# Altium PCB OpenRex_V1I1_PCB.PcbDoc (part 11 of 12)
Units mm, origin at the board's own origin, x right, y up, seen from the top; angles counter-clockwise.
Board outline 70 x 95 mm, 10 copper layers (L1, L2, L3, L4 (PWR), L5 (PWR), L6 (PWR), L7 (PWR), L8, L9, L10), stack 1.632 mm thick; 1080 components, 708 nets, 3831 pads, 2373 vias.
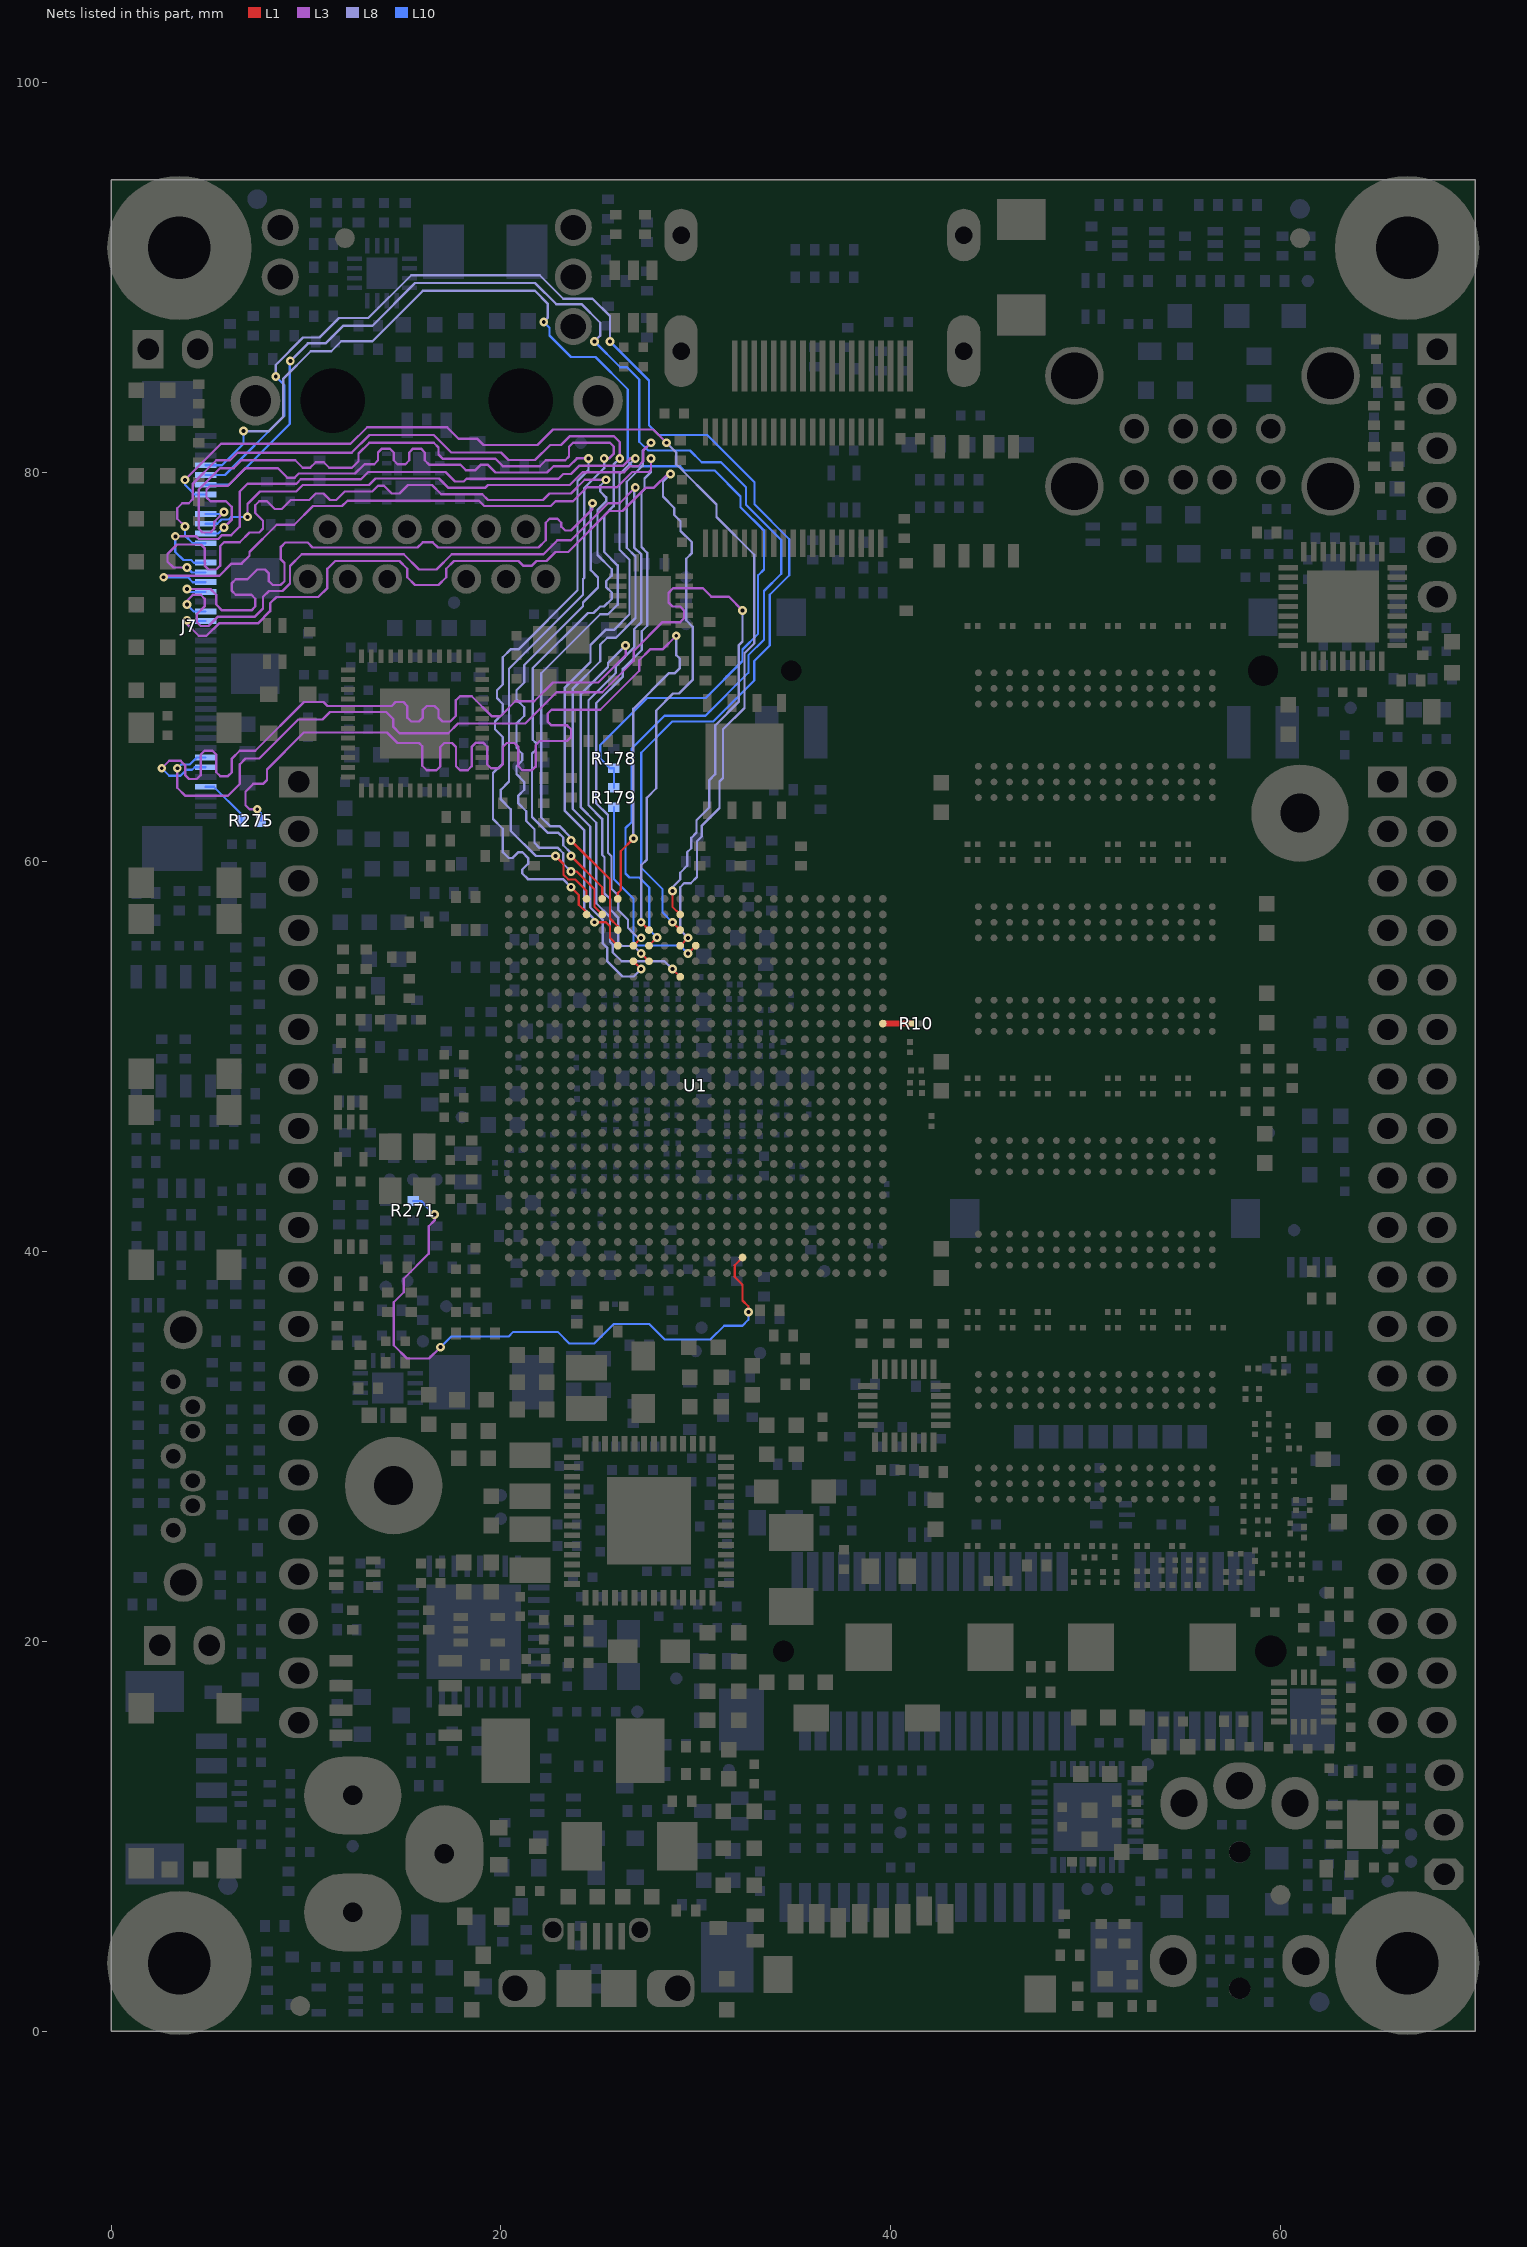
[diagram p19: the nets of this part, all layers, seen from the top]

## Via types
v1: diameter 0.45, hole 0.2, L1 to L10, tented both sides, 2369 vias
v2: diameter 1, hole 0.5, L1 to L10, tented top, 4 vias

## Nets (pads, with @x,y where several pads share a name; then routed paths per layer and width w, separated by ;. In a path a pad name is that pad's centre, name@x,y a point inside that pad or via, vN(x,y) a via of type N, cw(c..) or ccw(c..) an arc to the next point about the centre after c; other vN are vias at no path point) (continued)
VID_IN_CSI1_D10: J7.21 U1.K23 | length 58.1
  L1 w0.114: v1(27.2,56.9) U1.K23@27.6,56.5
  L3 w0.12: v1(3.9,72.4) 3.9,72.2 4.5,71.6 4.9,71.6 5.535,72.235 7.535,72.235 8.163,72.863 8.163,73.263 8.491,73.591 10.635,73.591 11.1,74.056 11.1,75.035 11.5,75.435 14.8,75.435 15.2,75.035 15.2,74.6 15.6,74.2 16.8,74.2 17.2,74.6 17.2,75.035 17.6,75.435 20.9,75.435 21.135,75.2 21.6,75.2 21.835,75.435 22.335,75.435 22.8,75.9 23.456,75.9 25.556,78 26.244,78 27.444,79.2 27.86,79.2 28.56,79.9 v1(28.7,79.9)
  L8 w0.12: v1(27.2,56.9) 27.2,59.828 27.491,60.119 27.491,63.291 27.972,63.772 27.972,67.769 28.838,68.635 29.135,68.635 29.837,69.337 29.837,72.063 29.509,72.391 29.509,75.553 29.8,75.844 29.8,76.4 29.22,76.98 29.22,77.48 28.9,77.8 28.9,78.156 28.315,78.741 28.315,79.515 v1(28.7,79.9)
  L10 w0.114: v1(3.9,72.4) 3.95,72.35 J7.21@4.85,72.35
VID_IN_CSI1_D11: J7.22 U1.K21 | length 58.1
  L1 w0.114: v1(27.2,55.3) U1.K21@27.6,54.9
  L3 w0.12: v1(3.9,73.2) 3.9,73.4 4.2,73.7 4.6,73.7 4.8,73.5 4.8,73.1 4.4,72.7 4.4,72.3 4.6,72.1 5,72.1 5.467,72.568 7.363,72.568 7.8,73.004 7.8,73.6 8.1,73.9 8.796,73.9 9.182,74.286 9.182,75.182 9.783,75.783 15.017,75.783 15.8,75 16.7,75 17.483,75.783 22.183,75.783 22.9,76.5 23.6,76.5 25.5,78.4 26.1,78.4 v1(26.9,79.2)
  L8 w0.12: v1(26.9,79.2) 26.838,79.138 26.838,76.133 27.21,75.762 27.21,72.31 26.838,71.938 26.838,70.994 25.9,70.056 25.9,69.7 24.495,68.295 24.495,62.905 25.195,62.205 25.195,60.364 25.32,60.239 25.32,58.38 25.61,58.09 25.61,57.55 26.015,57.145 26.015,55.885 26.215,55.685 26.815,55.685 v1(27.2,55.3)
  L10 w0.114: v1(3.9,73.2) 4.25,72.85 J7.22@4.85,72.85
VID_IN_CSI1_D12: J7.24 U1.G24 | length 58
  L1 w0.114: v1(23.6,59.5) 23.9,59.5 24.8,58.6 24.8,57.7 U1.G24@25.2,57.3
  L3 w0.12: v1(3.9,74) 5.1,74 5.4,73.7 5.4,73.2 5.7,72.9 7.2,72.9 7.4,73.1 7.4,73.5 7.2,73.7 6.4,73.7 6.2,73.9 6.2,74.3 6.4,74.5 7,74.5 7.5,75 7.9,75 8.1,74.8 8.1,74.4 8.3,74.2 8.7,74.2 8.9,74.4 8.9,75.326 8.715,75.511 8.715,76.159 8.941,76.385 10.088,76.385 10.342,76.131 15.731,76.131 16,76.4 16.5,76.4 16.769,76.131 21.931,76.131 22.3,76.5 22.3,77.4 22.5,77.6 22.9,77.6 23.1,77.4 23.1,77.2 23.3,77 23.6,77 24.7,78.1 v1(24.7,78.4)
  L8 w0.12: v1(23.6,59.5) 23.2,59.9 23.2,60.444 22.929,60.715 21.985,60.715 21.725,60.975 21.725,61.675 21.3,62.1 21.3,62.6 20.9,63 20.9,63.4 21.2,63.7 21.2,64.1 20.8,64.5 20.8,64.9 21.1,65.2 21.1,65.55 20.8,65.85 20.8,67.1 21.2,67.5 21.2,67.935 20.8,68.335 20.8,68.8 21.2,69.2 21.2,70.1 24.215,73.115 24.215,73.309 24.985,74.079 24.985,74.594 24.617,74.962 24.617,78.317 v1(24.7,78.4)
  L10 w0.114: v1(3.9,74) 4.05,73.85 J7.24@4.85,73.85
VID_IN_CSI1_D13: J7.25 U1.J22 | length 58.1
  L1 w0.114: U1.J22@26.8,55.7 v1(27.2,56.1)
  L3 w0.12: v1(2.7,74.6) 2.78,74.68 5.56,74.68 6.18,75.3 6.7,75.3 7.1,75.7 7.1,75.9 8.5,77.3 9.4,77.3 10.355,78.255 11.855,78.255 12.129,78.529 18.871,78.529 19.145,78.255 22.555,78.255 22.8,78.5 23.7,78.5 24.415,79.215 25.951,79.215 26.736,80 27.6,80 27.7,80.1 v1(27.7,80.7)
  L8 w0.12: v1(27.2,56.1) 27.045,56.1 26.525,56.62 26.525,57.031 26.015,57.541 26.015,58.285 25.68,58.62 25.68,60.29 25.5,60.47 25.5,62.4 24.899,63.001 24.899,68.143 26.26,69.504 26.26,69.9 27.233,70.873 27.233,71.833 27.515,72.115 27.515,72.599 27.515,75.853 27.215,76.153 27.215,78.959 27.372,79.117 27.372,79.668 27.7,79.996 v1(27.7,80.7)
  L10 w0.114: v1(2.7,74.6) 3.944,74.6 4.194,74.35 J7.25@4.85,74.35
VID_IN_CSI1_D14: J7.26 U1.G25 | length 58.1
  L1 w0.114: v1(23.6,60.3) 25.2,58.7 U1.G25@25.2,58.1
  L3 w0.12: v1(3.9,75.1) 3.2,75.1 2.9,75.4 2.9,75.8 3.385,76.285 4.615,76.285 4.8,76.1 4.8,75.2 5,75 5.4,75 5.6,75.2 5.6,76.206 5.603,76.208 ; 5.606,76.206 5.8,76.4 6.6,76.4 7.1,76.9 7.6,76.9 7.8,77.1 7.8,77.5 7.4,77.9 7.4,78.3 7.6,78.5 8,78.5 8.4,78.1 8.756,78.1 9.221,78.565 10.165,78.565 10.5,78.9 10.9,78.9 11.235,78.565 11.559,78.565 11.994,79 13.4,79 13.7,79.3 14,79.3 14.4,78.9 14.8,78.9 15.235,79.335 16.465,79.335 16.942,78.858 19.042,78.858 19.335,78.565 22.165,78.565 22.5,78.9 23.6,78.9 24.3,79.6 v1(25.4,79.6)
  L8 w0.12: v1(23.6,60.3) 23.6,60.455 23.2,60.855 23.2,61.244 22.959,61.485 22.415,61.485 21.6,62.3 21.6,65.556 21.8,65.756 21.8,66.1 21.638,66.262 21.638,69.938 24.465,72.765 24.759,72.765 25.094,73.1 25.294,73.1 25.685,73.491 25.685,73.815 25.4,74.1 25.4,74.4 25.685,74.685 25.685,75.015 24.959,75.741 24.959,78.048 25.4,78.489 25.4,78.7 25.1,79 25.1,79.3 v1(25.4,79.6)
  L10 w0.114: v1(3.9,75.1) 4.15,74.85 J7.26@4.85,74.85
VID_IN_CSI1_D15: J7.27 U1.H22 | length 58.1
  L1 w0.114: v1(24.8,56.9) 25.4,56.9 25.6,56.7 25.6,56.1 U1.H22@26,55.7
  L3 w0.12: v1(3.3,76.7) 4.365,76.7 4.5,76.565 5.5,76.565 5.7,76.765 6.165,76.765 6.6,77.2 6.6,79 7,79.4 9.51,79.4 9.738,79.628 12.828,79.628 13.2,80 17.156,80 17.641,79.515 18.1,79.515 18.24,79.655 22.955,79.655 23.2,79.9 23.6,79.9 24.015,80.315 26.259,80.315 26.644,80.7 v1(26.9,80.7)
  L8 w0.12: v1(24.8,56.9) 24.8,57.048 24.287,57.562 24.287,61.613 23.285,62.615 23.285,68.941 24.6,70.256 24.6,71.132 25.368,71.9 25.8,71.9 26.6,72.7 26.6,75.5 26.085,76.015 26.085,79.885 v1(26.9,80.7)
  L10 w0.114: v1(3.3,76.7) 3.3,75.9 3.715,75.485 4.115,75.485 4.25,75.35 J7.27@4.85,75.35
VID_IN_CSI1_D16: J7.29 U1.H23 | length 58.1
  L1 w0.114: v1(23.6,61.1) 25.6,59.1 25.6,57.096 26,56.696 U1.H23@26,56.5
  L3 w0.12: v1(3.8,77.2) 3.4,77.6 3.4,78.144 3.656,78.4 3.985,78.4 4.185,78.6 4.185,79.385 5.4,80.6 6.1,80.6 6.485,80.985 12.345,80.985 13.26,81.9 16.556,81.9 17.456,81 20,81 20.385,80.615 20.9,80.615 21.759,80.615 22.529,81.385 23.085,81.385 23.543,81.843 25.791,81.843 26.1,81.533 v1(26.1,80.7)
  L8 w0.12: v1(23.6,61.1) 23.6,61.24 23.005,61.835 22.525,61.835 22.077,62.283 22.077,65.636 22.08,65.64 22.08,66.216 22.077,66.219 22.077,69.673 25.104,72.7 25.5,72.7 25.99,73.19 25.99,75.21 25.3,75.9 25.3,77.768 25.785,78.253 25.785,80.385 v1(26.1,80.7)
  L10 w0.114: v1(3.8,77.2) 3.8,76.744 4.194,76.35 J7.29@4.85,76.35
VID_IN_CSI1_D17: J7.30 U1.F24 | length 58.1
  L1 w0.114: v1(23.6,58.7) 24,58.3 24,57.8 24.4,57.4 U1.F24@24.4,57.3
  L3 w0.12: v1(5.8,77.15) 6.185,77.535 6.185,78.215 5.9,78.5 5.1,78.5 4.9,78.7 4.9,79.1 5.1,79.3 6,79.3 6.9,80.2 8.556,80.2 9.041,79.715 9.429,79.715 9.635,79.922 12.522,79.922 13,80.4 13.5,80.4 13.7,80.6 13.7,81 13.9,81.2 14.3,81.2 14.5,81 14.5,80.6 14.7,80.4 15.1,80.4 15.3,80.6 15.3,81 15.5,81.2 15.9,81.2 16.1,81 16.1,80.6 16.32,80.38 17.92,80.38 18.2,80.1 18.7,80.1 18.98,80.38 19.32,80.38 19.725,79.975 22.375,79.975 22.7,80.3 23.5,80.3 23.9,80.7 v1(24.5,80.7)
  L8 w0.12: v1(23.6,58.7) 23.185,59.115 21.385,59.115 21.1,59.4 21.1,59.6 21.4,59.9 21.4,60.2 21.1,60.5 20.9,60.5 20.6,60.2 20.4,60.2 20.1,60.5 20.1,61.7 19.6,62.2 19.6,64.556 20.1,65.056 20.1,66.4 19.7,66.8 19.7,67.2 20.1,67.6 20.1,68.1 19.8,68.4 19.8,68.8 20.1,69.1 20.1,70.5 20.5,70.9 20.9,70.9 23.935,73.935 23.935,79.535 24.5,80.1 v1(24.5,80.7)
  L10 w0.114: J7.30@4.85,76.85 5.5,76.85 v1(5.8,77.15)
VID_IN_CSI1_D18: J7.31 U1.J21 | length 58.1
  L1 w0.114: U1.J21@26.8,54.9 v1(27.2,54.5)
  L3 w0.12: v1(7,77.7) 7,78.36 7.64,79 9.506,79 9.841,79.335 13.235,79.335 13.567,79.667 16.833,79.667 17.314,79.186 19.192,79.186 19.341,79.335 23.535,79.335 24.185,79.985 26.325,79.985 26.64,80.3 27.044,80.3 27.3,80.556 27.3,81.1 v1(27.7,81.5)
  L8 w0.12: 23.688,68.896 23.688,62.712 24.588,61.812 24.588,57.656 25.22,57.024 25.22,55.82 25.465,55.575 25.465,54.891 26.241,54.115 26.815,54.115 v1(27.2,54.5) ; 23.7,68.896 25.1,70.296 25.1,71.144 25.456,71.5 25.9,71.5 26.905,72.505 26.905,75.671 26.462,76.114 26.462,79.506 27.285,80.329 27.285,81.085 v1(27.7,81.5)
  L10 w0.114: J7.31@4.85,77.35 5.456,77.35 5.671,77.565 6.035,77.565 6.17,77.7 v1(7,77.7)
VID_IN_CSI1_D19: J7.32 U1.F25 | length 58
  L1 w0.114: v1(22.8,60.3) 23.215,59.885 23.215,59.341 23.456,59.1 23.8,59.1 24.4,58.5 U1.F25@24.4,58.1
  L3 w0.12: v1(5.8,77.95) 5.3,77.45 5.3,77.1 5.1,76.9 4.7,76.9 4.5,77.1 4.5,79.1 5.6,80.2 6.3,80.2 6.7,80.6 9.456,80.6 9.841,80.215 10.215,80.215 10.5,80.5 10.915,80.5 11.2,80.215 12.359,80.215 12.7,80.556 12.7,80.944 13.256,81.5 16.56,81.5 16.8,81.26 16.8,80.9 17.01,80.69 19.71,80.69 20.105,80.295 21.995,80.295 22.3,80.6 23.3,80.6 23.5,80.8 23.5,81.3 23.7,81.5 25.6,81.5 25.8,81.3 25.8,80.944 25.556,80.7 v1(25.3,80.7)
  L8 w0.12: v1(22.8,60.3) 21.8,60.3 20.5,61.6 20.5,62.7 20,63.2 20,63.7 20.415,64.115 20.415,69.905 24.215,73.705 24.215,74.509 24.276,74.571 24.276,79.176 25.3,80.2 v1(25.3,80.7)
  L10 w0.114: J7.32@4.85,77.85 5.7,77.85 v1(5.8,77.95)
VID_IN_CSI1_DE: J7.34 U1.M22 | length 58.1
  L1 w0.114: U1.M22@29.2,55.7 v1(29.6,56.1)
  L3 w0.12: v1(3.8,79.6) 5.647,81.447 12.289,81.447 13.142,82.3 17.244,82.3 17.844,81.7 18.8,81.7 19.115,81.385 21.879,81.385 22.679,82.185 27.815,82.185 v1(28.5,81.5)
  L8 w0.12: v1(28.5,81.5) 29,81 29,80.4 31.065,78.335 31.065,77.691 33,75.756 33,71.2 32.5,70.7 32.5,67.9 31.4,66.8 31.4,64.3 31.215,64.115 31.215,62.759 30.315,61.859 30.315,61.315 30.06,61.06 30.06,59.216 29.744,58.9 29.4,58.9 29.2,58.7 29.2,56.5 v1(29.6,56.1)
  L10 w0.114: v1(3.8,79.6) 3.8,79.344 4.294,78.85 J7.34@4.85,78.85
VID_IN_CSI1_HSYNC: J7.6 U1.M20 | length 58.2
  L1 w0.114: v1(28.8,54.5) U1.M20@29.2,54.1
  L3 w0.12: v1(2.6,64.8) 2.985,65.185 3.571,65.185 3.8,64.956 3.8,64.45 4,64.25 4.4,64.25 4.6,64.45 4.6,65.5 4.8,65.7 5.2,65.7 5.4,65.5 5.4,64.6 5.6,64.4 6,64.4 6.2,64.6 6.2,65.3 6.6,65.7 7.4,65.7 9.9,68.2 10.9,68.2 11.1,68 14.4,68 14.6,68.2 15,68.2 15.2,68 15.2,67.4 15.4,67.2 15.8,67.2 16,67.4 16,67.8 16.2,68 16.6,68 16.8,67.8 16.8,67.4 17,67.2 17.4,67.2 17.685,67.485 17.685,68.285 17.9,68.5 18.504,68.5 19.539,67.465 19.965,67.465 20.735,68.235 21.712,68.235 22.677,69.2 25,69.2 26.4,70.6 v1(26.4,71.1)
  L8 w0.12: v1(26.4,71.1) 25.5,70.2 25.5,70 24.092,68.592 24.092,62.808 24.89,62.01 24.89,57.874 25.6,57.164 25.6,55.904 25.745,55.759 25.745,55.355 26.2,54.9 28.4,54.9 v1(28.8,54.5)
  L10 w0.114: v1(2.6,64.8) 2.985,64.415 3.559,64.415 3.864,64.72 4.16,64.72 4.29,64.85 J7.6@4.85,64.85
VID_IN_CSI1_INT: J7.35 U1.K22 | length 71
  L1 w0.114: U1.K22@27.615,55.715 v1(28.015,56.115)
  L8 w0.12: v1(9.2,85.7) 10.1,86.6 11,86.6 11.9,87.5 13.4,87.5 15.6,89.7 21.756,89.7 22.842,88.614 24.144,88.614 25.1,87.659 25.1,87 v1(24.8,86.7)
  L10 w0.114: J7.35@4.85,79.35 6.05,79.35 9.164,82.464 9.164,85.664 v1(9.2,85.7) ; v1(24.8,86.7) 26.128,85.372 26.472,85.372 27.1,84.744 27.1,81.556 27.556,81.1 29.7,81.1 30.3,80.5 31.3,80.5 32.58,79.22 32.58,78.32 34.385,76.515 34.385,74.785 33.5,73.9 33.5,71.4 32.7,70.6 32.7,69.7 30.5,67.5 28.4,67.5 26.7,65.8 26.7,62.036 26.4,61.736 26.4,59.4 26.6,59.2 27.1,59.2 27.615,58.685 27.615,56.515 v1(28.015,56.115)
VID_IN_CSI1_INT2: J7.36 U1.M23 | length 70
  L1 w0.114: v1(28.8,56.9) U1.M23@29.2,56.5
  L8 w0.12: v1(8.45,84.9) 8.45,85.494 9.856,86.9 10.7,86.9 11.7,87.9 13.2,87.9 15.4,90.1 22,90.1 23.206,88.894 24.706,88.894 25.6,88 v1(25.6,86.7)
  L10 w0.114: J7.36@4.85,79.85 5.85,79.85 8.884,82.884 8.884,84.466 v1(8.45,84.9) ; v1(25.6,86.7) 27.6,84.7 27.6,82.4 28.1,81.9 30.596,81.9 33.015,79.481 33.015,78.341 34.8,76.556 34.8,74.7 33.8,73.7 33.8,71.1 33,70.3 33,69.3 30.9,67.2 28.8,67.2 27.2,65.6 27.2,59.7 28.3,58.6 28.3,57.4 v1(28.8,56.9)
VID_IN_CSI1_PIXCLK: R275.1 U1.H25 | length 55.7
  L1 w0.114: U1.H25@26,58.1 26,58.4 26.15,58.55 26.15,60.55 v1(26.8,61.2)
  L3 w0.12: v1(7.5,62.7) 7.1,62.7 6.9,62.9 6.9,63.6 7.3,64 7.8,64 8,64.2 8,64.744 9.891,66.635 14.165,66.635 14.7,66.1 15.8,66.1 15.965,65.935 15.965,64.935 16.2,64.7 16.7,64.7 16.895,64.895 16.895,65.895 17.1,66.1 17.5,66.1 17.7,65.9 17.7,64.895 ; 17.7,64.9 17.9,64.7 18.3,64.7 18.5,64.9 18.5,65.9 18.705,66.105 19.105,66.105 19.3,65.91 19.3,65 19.5,64.8 19.9,64.8 20.1,65 20.1,65.9 20.3,66.1 20.7,66.1 20.9,65.9 20.9,64.9 21.1,64.7 21.6,64.7 21.785,64.885 21.785,65.985 22,66.2 23.4,66.2 23.6,66.4 23.6,66.8 23.4,67 22.6,67 22.4,67.2 22.4,67.6 22.6,67.8 25.1,67.8 27.1,69.8 27.1,70.344 27.656,70.9 28.3,70.9 v1(29,71.6)
  L8 w0.12: v1(26.8,61.2) 26.8,67.856 28.629,69.685 28.929,69.685 29.185,69.941 29.185,70.423 29,70.608 v1(29,71.6)
  L10 w0.114: v1(7.5,62.7) 7.7,62.5 R275.1@7.7,62.1
VID_IN_CSI1_PIXCLK_R: J7.4 R275.2 | length 2.8
  L10 w0.114: J7.4@4.85,63.85 5.276,63.85 6.7,62.426 R275.2@6.7,62.1
VID_IN_CSI1_RSTN: J7.37 R178.1 R179.1 | length 61.4
  L8 w0.12: v1(6.8,82.1) 8.1,82.1 8.842,82.842 8.842,84.797 10.244,86.2 11.3,86.2 11.815,86.715 13.415,86.715 16,89.3 21.744,89.3 22.4,88.644 22.4,87.9 v1(22.2,87.7)
  L10 w0.114: J7.37@4.85,80.35 5.694,80.35 6.8,81.456 v1(6.8,82.1) ; v1(22.2,87.7) 22.5,87.4 22.5,87 23.6,85.9 24.856,85.9 26.515,84.241 26.515,80.541 26.756,80.3 29.2,80.3 29.415,80.085 30.959,80.085 32.3,78.744 32.3,78.2 33.5,77 33.5,75 33.2,74.7 33.2,71.7 32.4,70.9 32.4,70.3 30.5,68.4 27.5,68.4 25.1,66 25.1,65.3 25.6,64.8 R178.1@25.8,64.8 R179.1@25.8,63.8
VID_IN_CSI1_RSTN_R: R179.2 U1.N22 | length 10.9
  L1 w0.114: v1(29.6,55.3) U1.N22@30,55.7
  L10 w0.114: R179.2@25.8,62.8 25.8,59.1 26.8,58.1 26.8,55.9 26.985,55.715 29.185,55.715 v1(29.6,55.3)
VID_IN_CSI1_VSYNC: J7.7 U1.M24 | length 58.1
  L1 w0.114: v1(28.8,58.5) 28.8,57.7 U1.M24@29.2,57.3
  L3 w0.12: v1(3.4,64.8) 3.4,63.8 3.815,63.385 5.985,63.385 6.6,64 6.6,65 6.9,65.3 7.6,65.3 9.6,67.3 10.844,67.3 11.229,67.685 14.115,67.685 14.485,67.315 14.485,66.915 14.8,66.6 17.3,66.6 17.8,67.1 21.256,67.1 22.856,68.7 25.2,68.7 26.82,70.32 26.82,70.82 28.3,72.3 29.2,72.3 29.4,72.5 29.4,72.9 29.2,73.1 28.8,73.1 28.6,73.3 28.6,73.8 28.835,74.035 30.365,74.035 30.8,73.6 31.7,73.6 v1(32.4,72.9)
  L8 w0.12: v1(28.8,58.5) 28.8,58.7 29.2,59.1 29.2,59.444 29.556,59.8 29.556,60.491 29.765,60.7 29.765,61.23 30.035,61.5 30.035,62.135 30.7,62.8 30.7,64.2 31,64.5 31,67 32.2,68.2 32.2,71.1 32.4,71.3 v1(32.4,72.9)
  L10 w0.114: v1(3.4,64.8) 3.6,65 4.044,65 4.394,65.35 J7.7@4.85,65.35
WD_OUT: R271.1 U1.T2 | length 33.1
  L1 w0.114: U1.T2@32.4,39.7 32,39.3 32,38.7 32.4,38.3 32.4,37.5 32.7,37.2 v1(32.7,36.9)
  L3 w0.12: v1(16.6,41.9) 16.6,41.6 16.3,41.3 16.3,39.9 15.015,38.615 15.015,37.915 14.5,37.4 14.5,35.2 15.185,34.515 16.315,34.515 v1(16.9,35.1)
  L10 w0.114: R271.1@15.5,42.6 15.9,42.6 v1(16.6,41.9) ; v1(16.9,35.1) 17.45,35.65 20.406,35.65 20.641,35.885 22.915,35.885 23.515,35.285 24.785,35.285 25.785,36.285 27.615,36.285 28.4,35.5 30.756,35.5 31.456,36.2 32.4,36.2 32.7,36.5 v1(32.7,36.9)
ZQPAD: R10.1 U1.AE17 | length 1.4
  L1 w0.3: U1.AE17@39.6,51.7 R10.1@41.035,51.7
pads on no net: FID1.1 FID2.1 FID3.1 FID4.1 FID5.1 FID6.1 FID7.1 FID8.1 J6. J14.5 J14.7 J15.3 J15.5 J15.7 J15.45 J15.47 J15.55 J15.56 J16.7 J16.8 U1.A9 U1.A10 U1.A11 U1.AA1 U1.AA2 U1.AA3 U1.AA4 U1.AA11 U1.AB1 U1.AB2 U1.AB17 U1.AD17 U1.B9 U1.B10 U1.B11 U1.B20 U1.C5 U1.C8 U1.C16 U1.C19 U1.C20 U1.D5 U1.D16 U1.D18 U1.D19 U1.D20 U1.E1 U1.E2 U1.E13 U1.E16 U1.E18 U1.E25 U1.F1 U1.F2 U1.F13 U1.F15 U1.F18 U1.G1 U1.G2 U1.G4 U1.H1 U1.H2 U1.H3 U1.H4 U1.H24 U1.J19 U1.J20 U1.J23 U1.J24 U1.K20 U1.L1 U1.L3 U1.L4 U1.L6 U1.M2 U1.M4 U1.M5 U1.M6 U1.N5 U1.N6 U1.N19 U1.N20 U1.N21 U1.N23 U1.P4 U1.P5 U1.P6 U1.P20 U1.R3 U1.R5 U1.R20 U1.R21 U1.R23 U1.T20 U1.T23 U1.U20 U1.U22 U1.V24 U1.W6 U1.W20 U1.W21 U1.W23 U1.Y1 U1.Y2 U1.Y3 U1.Y4 U2.J1 U2.J9 U2.L1 U3.J1 U3.J9 U3.L1 U4.J1 U4.J9 U4.L1 U5.J1 U5.J9 U5.L1 U7.43 U9.33 U13.18 U13.20 U14.8 U14.9 U14.11 U14.12 U14.17 U14.18 U14.19 U14.22 U14.28 U26.3 U26.4 U29.1 U33.1

## Polygon pours and split planes (outlines as drawn)
+VIN_5V on L6 (PWR) "L6" (solid, remove dead copper, pour order 335): 47 vertices, not listed, extent 1,1 69,94
+V_INPUT on L6 (PWR) "L6" (solid, remove dead copper, pour order 334): 1,1 24,1 24,7.1 19.9,11.2 1,11.2
+PCIE_VP on L6 (PWR) "L6" (solid, remove dead copper, pour order 321): 25.3,43.6 25.6,43.6 26.2,43 26.2,41.4 24.3,39.5 24.3,37 20.6,37 20.6,40.8 22.4,40.8 24,42.4 24.8,42.4 25.3,42.9
+SATA_VP on L6 (PWR) "L6" (solid, remove dead copper, pour order 318): 24.7,37 25.8,37 27.8,39 27.8,44.4 26.2,46 26.2,47.2 25,48.4 24.2,48.4 24.2,44.8 25,44 25.8,44 26.6,43.2 26.6,41.2 24.7,39.3
+PCIE_VPH on L6 (PWR) "L6" (solid, remove dead copper, pour order 322): 20.6,41.2 22.2,41.2 23.8,42.8 24.6,42.8 24.9,43.1 24.9,43.6 23.7,44.8 21.6,44.8 20.6,43.8
+1V375_CORE on L6 (PWR) "L6" (solid, remove dead copper, pour order 323): 46 vertices, not listed, extent 21.8,30.219 60.4,66
+3V3_HDR_J2 on L6 (PWR) "L6" (solid, remove dead copper, pour order 324): 69,66 60.8,66 60.8,62.4 56.2,57.8 56.2,57.6 56.2,36.4 69,36.4
+2V5_ETH_DVDDH on L6 (PWR) "L6" (solid, remove dead copper, pour order 325): 28 vertices, not listed, extent 9.4,54 24.6,70.8
+3V3_ETH_AVDDH on L6 (PWR) "L6" (solid, remove dead copper, pour order 326): 12.4,70.6 12.4,71 14,72.6 16,72.6 17.2,73.8 22.6,73.8 22.6,69 19.4,69 18.8,69.6 18.2,70.2 12.8,70.2
+5V on L6 (PWR) "L6" (solid, remove dead copper, pour order 327): 80 vertices, not listed, extent 7.2,17.4 65,82.6
+1V5_DDR on L6 (PWR) "L6" (solid, remove dead copper, pour order 328): 30.6,18 31.6,18 31.6,19.9 29.9,21.6 28.8,21.6 28.8,21 30.4,19.4 30.4,18.2
+1V8_AUDIO on L6 (PWR) "L6" (solid, remove dead copper, pour order 329): 31 vertices, not listed, extent 23,14.6 53,24.4
+0V75_DDR_VTT on L6 (PWR) "L6" (solid, remove dead copper, pour order 330): 47 vertices, not listed, extent 15.8,9 69,36
+MPCIE_SIM_VPP on L6 (PWR) "L6" (solid, remove dead copper, pour order 331): 48.4,24.8 52.2,24.8 52.8,25.4 52.8,26 52.8,30.6 48.4,30.6
+3V3_COMP on L6 (PWR) "L6" (solid, remove dead copper, pour order 333): 63,19 69,19 69,11.8 62.2,11.8 57.8,11.8 57.8,13.8 63,19
+VDDUSB on L5 (PWR) "L5" (solid, remove dead copper, pour order 336): 24.4,44.6 23.4,43.6 19.8,43.6 19.8,44.8 20.6,45.6 23.6,45.6 24.4,44.8
+PCIE_VPTX on L5 (PWR) "L5" (solid, remove dead copper, pour order 337): 19.8,43.2 23.6,43.2 24.6,44.2 25,44.2 25.2,44 25.4,44 25.4,43.8 25.4,43.2 23,40.8 23,40.2 22.4,40.2 19.8,40.2
+2V5_VDDHIGH_VPH on L5 (PWR) "L5" (solid, remove dead copper, pour order 339): 18 vertices, not listed, extent 23.4,40.2 29.6,47.2
+SATA_VPH on L5 (PWR) "L5" (solid, remove dead copper, pour order 340): 25.2,47.8 24,49 23.2,49.8 21.6,49.8 17.8,49.8 17.8,52 25.2,52 26.2,51 26.2,50.4 26.2,47.8
+NVCC_RGMII on L5 (PWR) "L5" (solid, remove dead copper, pour order 341): 24.6,52.4 25,52.4 25,53 24.6,53.4 24.6,58.6 16.4,58.6 16.4,52.4
+VDDPU on L5 (PWR) "L5" (solid, remove dead copper, pour order 342): 26.6,47.6 29,47.6 29.4,48 29.4,51 29.4,51.2 34.2,51.2 34.2,58.6 25,58.6 25,53.6 25.4,53.2 25.4,52.4 26.6,51.2 26.6,47.8
+1V1_VDDSOC_CAP on L5 (PWR) "L5" (solid, remove dead copper, pour order 343): 24 vertices, not listed, extent 23,36 34.2,50.8
+0V75_DDR_VTT on L5 (PWR) "L5" (solid, remove dead copper, pour order 344): 22.9,27 20.6,27 18.6,29 18.6,31.8 19.8,31.8 20.6,31.8 20.6,31 20.6,30.2 20.6,29.8 22.9,27.5
+1V375_SOC on L5 (PWR) "L5" (solid, remove dead copper, pour order 346): 19.2,32.2 23.2,32.2 23.2,33.4 23,33.6 17.4,33.6 15.8,35.2 15.6,35.2 15.4,35 15.4,34.2 17.2,32.4 17.4,32.2
+1V2_PMIC on L5 (PWR) "L5" (solid, remove dead copper, pour order 347): 28 vertices, not listed, extent 22.6,27.1 43.4,83.2
+5V on L5 (PWR) "L5" (solid, remove dead copper, pour order 349): 32.8,23 35.2,23 37,23 37,24.8 37,30.6 36,30.6 35.2,29.8 35.2,28.4 33.4,26.6 32.4,26.6 32.4,23.4
+3V0_ALWAYS on L5 (PWR) "L5" (solid, remove dead copper, pour order 350): 92 vertices, not listed, extent 1,21 34.2,52
SPLIT on L5 (PWR) "L5" (solid, remove dead copper, pour order 352): 2.6,47.4 2.6,45 7.4,45 7.4,46.4 7.4,47.4 6.6,48.2 3.6,48.2 3.4,48.2
+VCC_CAN on L5 (PWR) "L5" (solid, remove dead copper, pour order 353): 19 vertices, not listed, extent 1,42.8 13.4,56.2
+1V2_ETH on L5 (PWR) "L5" (solid, remove dead copper, pour order 355): 19 vertices, not listed, extent 10.8,59 34.2,82.4
+1V2_ETH_DVDDL on L5 (PWR) "L5" (solid, remove dead copper, pour order 356): 9.4,62.4 17.8,62.4 18.2,62.8 20,64.6 20,65.4 20,66.2 19,67.2 16.4,69.8 16.4,71.2 13,71.2 8.8,67 8.8,63
+5V_HDMI_CON on L5 (PWR) "L5" (solid, remove dead copper, pour order 358): 30.2,81 31.8,79.4 37.2,79.4 39.8,79.4 39.8,82 43.1,85.3 43.1,87.8 38.4,87.8 36.6,87.8 31,82.2 30.2,82.2
+5V_USB_BOT on L5 (PWR) "L5" (solid, remove dead copper, pour order 359): 23 vertices, not listed, extent 40.2,75.8 60.2,89.8
+5V_USB_TOP on L5 (PWR) "L5" (solid, remove dead copper, pour order 360): 48.4,88 50.6,88 51.6,87 57.6,81 58.2,81 60.2,81 60.2,80.4 60.2,79.2 60.2,76 60.2,75.8 48.4,75.8
+3V3_HDR on L5 (PWR) "L5" (solid, remove dead copper, pour order 361): 44 vertices, not listed, extent 1,44.6 69,94
+MPCIE_SIM_PWR on L5 (PWR) "L6" (solid, remove dead copper, pour order 365): 51,22.4 51,23.8 52.4,25.2 55.6,25.2 56,24.8 56.2,24.6 56.2,22 55.8,22 55.4,22.4
+3V3_GYRO_IO on L5 (PWR) "L6" (solid, remove dead copper, pour order 366): 37.4,23 45.6,23 45.6,28.8 45.6,35.4 44,37 42,37 37.4,37
+3V0_VSNVS on L5 (PWR) "L6" (solid, remove dead copper, pour order 367): 60 vertices, not listed, extent 1,12.8 33.8,29.2
+3V3_COMP_IO on L5 (PWR) "L5" (solid, remove dead copper, pour order 369): 69,22.6 69,1 60.4,1 60.4,20.6 62.4,22.6 69,22.6
+1V5_DDR on L5 (PWR) "L5" (solid, remove dead copper, pour order 370): 31.2,18.2 31.6,18.6 33.8,18.6 33.8,14.4 34.4,13.8 35.2,13 35.2,10.4 34.4,9.6 33.2,9.6 31.2,11.6
+3V3_MCU on L5 (PWR) "L5" (solid, remove dead copper, pour order 371): 30 vertices, not listed, extent 1,1 60,25.4
GND on L1 "Power Plane" (solid, pour order 320): 21.6,17.9 21.6,19.6 21.1,20.1 20.7,20.1 20.6,20 20.6,19.8 20.7,19.7 20.7,19.4 20.7,18.2 21,17.9 21.1,17.8 21.6,17.8
+5V_USB_BOT on L1 "L10" (solid, remove dead copper, pour order 351): 42.8,81.3 42.8,83 42.6,83.2 42.3,83.2 42,82.9 42,82.1 42,81.5 42.2,81.3
GND on L1 "L1" (solid, pour order 417): 20 vertices, not listed, extent 30.591,51.5 33.4,52.7
GND on L1 "L10" (solid, remove dead copper, pour order 625): 41.9,25.3 42.9,25.3 43.2,25.6 43.2,26.4 42.8,26.4 42.6,26.2 41.9,26.2
+1V5_DDR on L1 "L10" (solid, remove dead copper, pour order 624): 41.9,26.8 42.8,26.8 43.5,27.5 43.5,27.6 42.9,28.2 42.7,28.2 42.4,28.2 41.9,27.7 41.9,26.8
FB_1V375 on L1 "L10" (solid, remove dead copper, pour order 623): 12.5,35.5 12.5,34.9 13.1,34.9 13.5,34.5 13.7,34.3 13.7,34.2 13.7,34.1 13.8,34 14.4,34 14.4,35.7 12.7,35.7 12.5,35.5
+DDR_VREF on L1 "L1" (solid, remove dead copper, pour order 363): 57.9,47.9 59.7,47.9 59.7,48.5 60.3,49.1 60.4,49.2 60.9,49.2 60.9,49.7 57.9,49.7
+1V5_DDR on L1 "L1" (solid, remove dead copper, pour order 364): 57.9,50.1 59.7,50.1 59.7,52.1 58.9,52.1 58.1,51.3 57.9,51.1
GND on L1 "L1" (solid, remove dead copper, pour order 386): 13.2,69.6 18,69.6 18,64.6 13.2,64.6
GND on L1 "L1" (solid, remove dead copper, pour order 387): 23.4,72.1 24.5,72.1 24.5,70.3 24.4,70.2 23.4,70.2 23.2,70.4 23.2,70.6 23.3,70.7 23.4,70.8 23.4,72.1
GND on L1 "L1" (solid, remove dead copper, pour order 393): 2.2,40.1 2.2,38.55 0.55,38.55 0.4,38.7 0.4,39.95 0.55,40.1
+VIN_4V2 on L1 "L1" (solid, remove dead copper, pour order 394): 14.3,30.7 16.7,30.7 16.7,31.5 16,31.5 15.5,32 14.3,32
GND on L1 "L1" (solid, remove dead copper, pour order 395): 17 vertices, not listed, extent 12.1,30.9 14,33.8
GND on L1 "L1" (solid, remove dead copper, pour order 396): 16.7,33.1 16.7,32.2 14.7,32.2 14.5,32.4 14.5,33.6 14.6,33.7 14.9,33.7 16.1,33.7
GND on L1 "L1" (solid, remove dead copper, pour order 398): 18.2,32.8 18.2,31.7 18.3,31.6 18.3,29 17.5,29 17,29.5 17,29.7 17,30.9 17,32.4 17.4,32.8
+0V75_DDR_VTT on L1 "L1" (solid, remove dead copper, pour order 399): 22.5,30.2 22.5,28.9 19.9,28.9 19.8,29 18.9,29 18.9,31.4 18.8,31.5 18.8,32.8 19.6,32.8 19.7,32.8 19.7,32 19.9,31.8 19.9,30.8 20.5,30.2
GND on L1 "L1" (solid, remove dead copper, pour order 401): 18 vertices, not listed, extent 19.9,30.9 21.7,35.6
+1V375_SOC on L1 "L1" (solid, remove dead copper, pour order 402): 21.9,35.1 21.9,31.5 22.7,31.5 23,31.8 23,32 23,33 23.4,33.4 25.4,33.4 25.4,34.7 23.6,34.7 23.3,35 23.2,35.1
SW1CLX on L1 "L1" (solid, remove dead copper, pour order 403): 26,30.1 26,31.4 25.7,31.7 25.7,32.4 25.5,32.6 23.4,32.6 23.4,31.3 25,31.3 25.6,30.7 25.7,30.6 25.7,30.1
SW1LX on L1 "L1" (solid, remove dead copper, pour order 404): 27.5,30.2 26.7,30.2 26.7,32.7 27.9,32.7 27.9,31.2 27.5,30.8 27.5,30.7
+1V375_CORE on L1 "L1" (solid, remove dead copper, pour order 405): 26.7,35.4 26.8,35.5 30.1,35.5 30.1,34.7 30.3,34.5 33.3,34.5 33.3,33.8 32.55,33.8 32.3,33.55 31.85,33.1 28.7,33.1 27.9,33.9 26.7,33.9
GND on L1 "L1" (solid, remove dead copper, pour order 406): 30.8,34.7 30.8,35.5 31.1,35.5 31.5,35.9 31.8,35.9 32.2,35.5 32.2,35.1 31.8,34.7 31.5,34.7 30.8,34.7
GND on L1 "L1" (solid, remove dead copper, pour order 407): 18 vertices, not listed, extent 29.3,31.5 33.3,33.1
GND on L1 "L1" (solid, remove dead copper, pour order 408): 34.1,31.5 34.1,29.3 33.9,29.1 32.8,29.1 32.7,29.1 32.6,29.2 32.6,30.9 32.6,31 33.1,31.5
+5V on L1 "L1" (solid, remove dead copper, pour order 410): 34.7,31.5 35.4,31.5 36.1,30.8 36.8,30.8 36.8,29.1 37.1,28.8 37.2,28.7 37.2,27.1 35.9,27.1 35.9,28.3 35.7,28.5 35.5,28.7 35.1,28.7 34.7,29.1
GND on L1 "L1" (solid, remove dead copper, pour order 392): 2.2,48.05 2.2,46.5 0.55,46.5 0.4,46.65 0.4,47.9 0.55,48.05
GND on L1 "L1" (solid, remove dead copper, pour order 391): 2.2,49.9 2.2,48.35 0.55,48.35 0.4,48.5 0.4,49.75 0.55,49.9
GND on L1 "L1" (solid, remove dead copper, pour order 390): 2.2,57.85 2.2,56.3 0.55,56.3 0.4,56.45 0.4,57.7 0.55,57.85
GND on L1 "L1" (solid, remove dead copper, pour order 389): 2.2,59.7 2.2,58.15 0.55,58.15 0.4,58.3 0.4,59.55 0.55,59.7
GND on L1 "L1" (solid, remove dead copper, pour order 388): 2.2,67.65 2.2,66.1 0.55,66.1 0.4,66.25 0.4,67.5 0.55,67.65
GND on L1 "L1" (solid, remove dead copper, pour order 415): 2.2,17.4 2.2,15.6 1.9,15.3 0.8,15.3 0.8,15.4 0.7,15.5 0.7,17.2 0.9,17.4
GND on L1 "L1" (solid, remove dead copper, pour order 420): 2.2,9.4 2.2,7.3 1.9,7 0.9,7 0.8,7 0.7,7.1 0.7,9 0.7,9.2 0.9,9.4
SWBSTLX on L1 "L1" (solid, remove dead copper, pour order 423): 31.6,24.3 31.6,24.6 32.5,24.6 32.9,25 33,25.1 33,28.3 34.3,28.3 34.3,27.1 34.8,26.6 36.1,26.6 36.1,24.6 33.8,24.6 33.5,24.3
+VIN_4V2 on L1 "L1" (solid, remove dead copper, pour order 426): 21 vertices, not listed, extent 33.7,20.8 39.6,24.3
GND on L1 "L1" (solid, remove dead copper, pour order 429): 40.4,24.2 41.3,24.2 41.7,23.8 42.2,23.3 42.2,22.2 42.2,22.1 42.1,22 40.4,22 40.3,22.1 40.3,22.2 40.4,22.3 40.4,24.2
GND on L1 "L1" (solid, remove dead copper, pour order 432): 37.7,20.9 40.1,20.9 40.1,18.5 40.3,18.3 40.3,18 40.2,17.9 38.6,17.9 38.3,17.9 37.7,18.5
+VIN_5V on L1 "L1" (solid, remove dead copper, pour order 435): 36.2,18.3 36.2,17.5 36.5,17.5 37,17 37.1,16.9 37.4,16.9 37.5,17 37.5,17.1 37.5,18.8 37.4,18.9 37.3,18.9 36.8,18.9 36.2,18.3
+5V on L1 "L1" (solid, remove dead copper, pour order 438): 32.8,18.9 33,19.1 33.3,19.1 33.4,19.1 34.1,18.4 34.1,17.5 33.2,17.5 32.8,17.9 32.8,18.9
+5V_MPCIE on L1 "L1" (solid, remove dead copper, pour order 441): 31 vertices, not listed, extent 31.3,13.4 36.8,18.3
GND on L1 "L1" (solid, remove dead copper, pour order 444): 30.2,20.9 30.8,20.9 31.3,21.4 31.8,21.4 32.9,21.4 33.6,20.7 33.6,20.5 33.3,20.2 32.8,20.2 32.6,20 31.9,20 31.5,19.6 31.3,19.6 30.9,20 30.2,20
+1V5_DDR on L1 "L1" (solid, remove dead copper, pour order 448): 28.2,20.1 29.7,20.1 29.9,19.9 30,19.8 30,19.6 30.2,19.4 32.6,19.4 32.6,17 30.2,17 30.2,17.4 29.7,17.9 28.7,18.9 28.2,18.9
GND on L1 "L1" (solid, remove dead copper, pour order 451): 30.2,16.4 32.6,16.4 32.6,15.5 32.2,15.1 30.1,15.1 30,15.2 30,16.2
+VIN_4V2 on L1 "L1" (solid, remove dead copper, pour order 452): 25.9,16 25.9,12.7 28.4,12.7 28.4,14.4 29.6,15.6 29.7,15.7 29.7,17.4 29.5,17.6 29,17.6 27.4,17.6 25.9,16.1
GND on L1 "L1" (solid, remove dead copper, pour order 454): 31.3,13.4 32.3,13.4 32.8,12.9 33.3,12.9 33.3,12.3 33,12 31.6,12 31.3,12
+3V3 on L1 "L1" (solid, remove dead copper, pour order 457): 32.6,7.1 33.4,7.1 33.8,7.5 33.9,7.6 33.9,9.2 33.9,9.3 33.4,9.8 32.6,9.8 32.6,7.1
GND on L1 "L1" (solid, remove dead copper, pour order 460): 30.1,10.8 30.1,8.2 28,8.2 27.6,8.6 27.6,10.4 28,10.8
+VIN_5V on L1 "L1" (solid, remove dead copper, pour order 461): 25.2,8.2 25.2,10.8 25,10.8 21.5,14.3 21.5,16.1 21,16.1 18.7,18.4 17.8,19.3 17.2,19.3 17.2,12.5 18.3,11.4 20.3,11.4 21.4,10.3 21.4,9 22.2,8.2
+5V_USB_OTG on L1 "L1" (solid, remove dead copper, pour order 463): 28 vertices, not listed, extent 18.6,3.4 23.9,8
+5V_USB_OTG_Q on L1 "L1" (solid, remove dead copper, pour order 464): 18 vertices, not listed, extent 8.4,2.4 20.4,9
+V_INPUT on L1 "L1" (solid, remove dead copper, pour order 465): 17 vertices, not listed, extent 10.2,10.9 16.4,19.6
SW4LX on L1 "L1" (solid, remove dead copper, pour order 466): 23.6,26.6 23.6,26.3 22.9,26.3 22.6,26.6 22.4,26.8 22.1,26.8 20.4,26.8 20.4,28.1 22.6,28.1 22.6,27.2 23.1,26.7 23.2,26.6 23.6,26.6
SW2LX on L1 "L1" (solid, remove dead copper, pour order 467): 23.7,26.1 23.7,25.8 22.8,25.8 22.5,25.5 22.5,25.1 20.4,25.1 20.4,26.4 22.5,26.4 22.8,26.1
+3V3 on L1 "L1" (solid, remove dead copper, pour order 468): 18 vertices, not listed, extent 17.7,23 22.5,26.4
GND on L1 "L1" (solid, remove dead copper, pour order 469): 18 vertices, not listed, extent 18.5,27 20.2,28.9
GND on L1 "L1" (solid, remove dead copper, pour order 470): 15.7,23.3 17.1,23.3 17.2,23.3 17.2,22.8 17,22.6 16.6,22.2 16.4,22.2 16.1,22.2 15.6,22.7 15.6,23.3 15.7,23.3
GND on L1 "L1" (solid, remove dead copper, pour order 471): 20.1,23 20.3,22.8 20.3,22.5 20,22.2 19.6,21.8 18.9,21.8 18.7,21.8 18.4,22.1 17.3,22.1 17.1,22.3 17.1,22.4 17.4,22.7 17.7,23
+3V3_MCU on L1 "L1" (solid, remove dead copper, pour order 472): 22,19.4 22,17.8 22.6,17.8 22.9,18.1 23,18.2 23,19.3 22.9,19.4 22,19.4
SW3LX on L1 "L1" (solid, remove dead copper, pour order 473): 25.5,20.1 25.5,18.9 27,18.9 27,20.1 27.3,20.4 28,21.1 28,22.2 28,22.3 27.2,22.3 27.2,21.8 27,21.6 25.5,20.1
GND on L1 "L1" (solid, remove dead copper, pour order 474): 35,4 35,1.9 33.1,1.9 33.1,2 33,2.1 33,3.9 33.1,4 35,4
GND on L1 "L1" (solid, remove dead copper, pour order 475): 46.8,2.9 49,2.9 49.1,2.8 49.1,1 49,0.9 46.8,0.9
+3V3 on L1 "L1" (solid, remove dead copper, pour order 476): 53.4,15 54.3,15 54.3,14.2 54.5,14 54.9,14 55,13.9 55,13.7 55,13.6 54.8,13.4 53.9,13.4 53.4,13.9 53.4,15
GND on L1 "L1" (solid, remove dead copper, pour order 477): 49.1,20.9 51.5,20.9 51.5,18.5 50.9,17.9 49.4,17.9 49.1,18.2
+3V3_MPCIE on L1 "L1" (solid, remove dead copper, pour order 478): 98 vertices, not listed, extent 37.1,13.7 59.2,26.7
GND on L1 "L1" (solid, remove dead copper, pour order 479): 60,16.5 60,15.6 59.6,15.2 59.4,15.2 59.2,15.4 59.2,15.8 59.2,16.2 59.5,16.5 60,16.5
+1V5_DDR on L1 "L1" (solid, remove dead copper, pour order 480): 61.9,25.1 62.2,25.1 62.4,25.3 62.8,25.7 63.4,25.7 63.4,26.6 62.2,26.6 61.9,26.3 61.9,25.1
+0V75_DDR_VTT on L1 "L1" (solid, remove dead copper, pour order 481): 62.6,27.2 63.4,27.2 63.4,29 62.6,29.8 61.8,29.8 61.8,28.6 62.5,27.9 62.6,27.8 62.6,27.2
GND on L1 "L1" (solid, remove dead copper, pour order 482): 61.8,30.4 62.3,30.4 62.7,30 62.8,29.9 63,29.9 63.1,30 63.1,30.1 63.1,31.5 62.8,31.8 62.5,31.8 62.3,31.8 61.8,31.3
+VDDPU on L1 "L1" (solid, pour order 445): 39 vertices, not listed, extent 25.8,51.5 31,52.2
GND on L1 "L1" (solid, pour order 443): 39 vertices, not listed, extent 25.8,52.3 31,53
+1V375_SOC on L1 "L1" (solid, pour order 428): 47 vertices, not listed, extent 25.8,50.7 33.4,51.4
GND on L1 "L1" (solid, pour order 427): 48 vertices, not listed, extent 25.8,49.9 33.4,50.6
+1V375_CORE on L1 "L1" (solid, pour order 440): 34 vertices, not listed, extent 25.8,49.1 31.8,49.8
+1V2_VDD_ARM_CAP on L1 "L1" (solid, pour order 439): 30 vertices, not listed, extent 25.8,48 31.8,48.8
GND on L1 "L1" (solid, pour order 422): 28 vertices, not listed, extent 25.8,47.2 29.4,48.2
+1V5_DDR on L1 "L1" (solid, pour order 447): 40 vertices, not listed, extent 31,44.8 34.5,53
+1V2_VDD_ARM_CAP on L1 "L1" (solid, pour order 436): 41 vertices, not listed, extent 25.8,46.4 31.8,47.1
GND on L1 "L1" (solid, pour order 434): 26 vertices, not listed, extent 27.4,45.6 31.4,46.3
+1V375_CORE on L1 "L1" (solid, pour order 431): 41 vertices, not listed, extent 27.4,44.8 33.4,45.5
GND on L1 "L1" (solid, pour order 424): 50 vertices, not listed, extent 25.8,44 34.2,45
GND on L1 "L1" (solid, pour order 419): 22 vertices, not listed, extent 30.6,47.2 33.4,48.2
+1V1_VDDSOC_CAP on L1 "L1" (solid, pour order 413): 31.6,45.8 32.4,45.8 32.6,45.6 33,45.6 33.4,46 33.4,46.2 33.3,46.3 33.1,46.3 32.9,46.1 32.7,46.1 32.5,46.3 31.5,46.3 31.4,46.2 31.4,46
GND on L1 "L1" (solid, pour order 430): 32 vertices, not listed, extent 34.2,43.5 35.3,48.7
GND on L1 "L1" (solid, pour order 449): 37 vertices, not listed, extent 32.2,49.9 35.3,53.8
+1V1_VDDSOC_CAP on L1 "L1" (solid, pour order 416): 20 vertices, not listed, extent 32.2,48 33.4,49.8
+3V3 on L1 "L1" (solid, pour order 412): 20 vertices, not listed, extent 27.4,53.1 29.8,53.8
GND on L1 "L1" (solid, remove dead copper, pour order 483): 38.8,32 38.8,33.8 39,34 40.3,34 40.3,32.5 39.8,32 38.8,32
GND on L1 "L1" (solid, remove dead copper, pour order 484): 39.8,30.2 39.8,30.7 40.1,31 40.1,31.1 40,31.2 39.7,31.2 39.3,30.8 39.1,30.6 39.1,30.2
GND on L1 "L1" (solid, remove dead copper, pour order 485): 17 vertices, not listed, extent 42.1,29.8 43.7,34.4
+1V5_DDR on L1 "L1" (solid, remove dead copper, pour order 486): 42.2,39.1 42.2,38.2 42.9,38.2 43.1,38 43.2,37.9 43.6,37.9 44,38.3 44,38.9 43.8,39.1
+1V5_DDR on L1 "L1" (solid, remove dead copper, pour order 487): 42.2,49.3 43,49.3 43.7,50 43.7,50.4 43.4,50.7 42.7,50.7 42.2,50.2
+1V5_DDR on L1 "L1" (solid, remove dead copper, pour order 488): 42.2,63 42.2,61.9 42.6,61.5 43.2,61.5 43.7,62 43.9,62.2 43.9,62.6 43.5,63 42.2,63
+1V5_DDR on L1 "L1" (solid, remove dead copper, pour order 489): 59.7,58.3 59.7,57.4 58.4,57.4 58.3,57.5 58.3,58.4 58.4,58.5 58.8,58.5 59.5,58.5 59.7,58.3
+1V5_DDR on L1 "L1" (solid, remove dead copper, pour order 490): 59.6,46.5 59.6,45.6 58.5,45.6 58.4,45.7 58.3,45.8 58.3,46.5 58.5,46.7 59.1,46.7 59.4,46.7 59.6,46.5
GND on L1 "L1" (solid, remove dead copper, pour order 491): 59.6,45 59.6,44.1 59.4,43.9 58.4,43.9 58.3,44 58.3,45 59.6,45
GND on L1 "L1" (solid, remove dead copper, pour order 492): 59.7,52.8 59.7,53.8 59.1,54.4 58.8,54.4 58.3,53.9 58.3,53.2 58.7,52.8
GND on L1 "L1" (solid, remove dead copper, pour order 493): 58.4,56.8 60.1,56.8 60.1,56.3 59.7,55.9 58.9,55.9 58.4,56.4
GND on L1 "L1" (solid, remove dead copper, pour order 494): 42.2,63.6 43.7,63.6 43.9,63.8 44,63.9 44,65.2 43.8,65.4 43.6,65.4 43,64.8 42.9,64.7 42.7,64.7 42.4,64.7 42.2,64.5 42.2,63.6
GND on L1 "L1" (solid, remove dead copper, pour order 495): 42.2,39.7 43,39.7 43.2,39.5 43.5,39.5 43.5,40.7 43.1,41.1 42.6,41.1 42.2,40.7 42.2,39.7
+0V75_DDR_VTT on L1 "L1" (solid, remove dead copper, pour order 496): 50.7,25.1 51,25.1 51.2,24.9 51.2,24.6 51.3,24.5 51.7,24.5 51.7,23.4 50.7,23.4 50.7,23.7 50.8,23.8 50.8,24.6 50.7,24.7
+0V75_DDR_VTT on L1 "L1" (solid, remove dead copper, pour order 497): 19 vertices, not listed, extent 53,22.1 56.2,23.8
+1V5_DDR on L1 "L1" (solid, remove dead copper, pour order 498): 54.3,22.1 54.8,22.1 55.4,22.7 55.4,23.1 54.3,23.1 54.3,22.1
GND on L1 "L1" (solid, remove dead copper, pour order 499): 54.8,24 54.8,24.4 54.6,24.6 54.6,25.4 54.4,25.6 54,25.6 53.7,25.3 53.7,24
+0V75_DDR_VTT on L1 "L1" (solid, remove dead copper, pour order 500): 22 vertices, not listed, extent 57,22.8 59.3,24.7
+0V75_DDR_VTT on L1 "L1" (solid, remove dead copper, pour order 501): 61.7,22.6 61.7,23.7 61.3,24.1 59.5,24.1 59.5,23.7 60.6,23.7 60.9,23.4 60.9,22.9 61.2,22.6 61.3,22.5 61.7,22.5
+0V75_DDR_VTT on L1 "L1" (solid, remove dead copper, pour order 502): 59.4,26.7 59.4,26.8 59.1,27.1 57.9,27.1 57.9,26 58.3,26 58.5,25.8 58.6,25.7 58.6,25.3 59,25.3 59,26.4 59.2,26.6 59.3,26.6 59.4,26.7
+0V75_DDR_VTT on L1 "L1" (solid, remove dead copper, pour order 503): 23 vertices, not listed, extent 58.5,27.3 60.9,29.1
+0V75_DDR_VTT on L1 "L1" (solid, remove dead copper, pour order 504): 17 vertices, not listed, extent 58.5,29.7 60.6,31.3
+0V75_DDR_VTT on L1 "L1" (solid, remove dead copper, pour order 505): 58,32.8 59.1,32.8 59.1,33.3 59.4,33.6 59.8,33.6 59.8,34.7 59.5,34.7 59,34.2 58.7,34.2 58.7,33.8 58.5,33.6 58,33.1 58,32.8
+0V75_DDR_VTT on L1 "L1" (solid, remove dead copper, pour order 506): 61.4,25.7 61,25.7 60.8,25.9 60.3,25.9 60.3,26.3 60.6,26.6 60.6,26.9 61.7,26.9 61.9,27.1 62.1,27.1 62.2,27 62.2,26.9 61.4,26.1
GND on L1 "L1" (solid, remove dead copper, pour order 507): 65.2,66.7 66,66.7 66.3,67 66.3,68 66.3,68.2 66.6,68.5 66.6,68.7 66.5,68.8 66.4,68.8 65.8,68.8 65.4,68.4 65.1,68.1 65.1,66.8 65.2,66.7
+5V_HDR_J2 on L1 "L1" (solid, remove dead copper, pour order 508): 66.8,66.6 67.8,66.6 68.2,67 68.2,68.4 67.3,68.4 67.3,67.2 67.1,67 66.9,67 66.8,67 66.7,66.9 66.7,66.7 66.8,66.6
GND on L1 "L1" (solid, remove dead copper, pour order 509): 58.5,77.6 58.9,77.6 59.1,77.4 59.1,76.3 59,76.2 58.9,76.2 58.5,76.6
+5V_USB_TOP on L1 "L1" (solid, remove dead copper, pour order 510): 22 vertices, not listed, extent 45.2,81.1 48.8,89.1
GND on L1 "L1" (solid, remove dead copper, pour order 512): 45.4,94 48.2,94 48.6,93.6 48.6,92.3 48.2,91.9 45.4,91.9
+VIN_5V on L1 "L1" (solid, remove dead copper, pour order 513): 43.5,80.8 44,80.8 44,81.8 44.2,82 44.2,82.3 44.1,82.4 43.1,82.4 43,82.3 43,82.1 43.5,81.6
GND on L1 "L1" (solid, pour order 418): 25 vertices, not listed, extent 22.6,43.1 25,45.1
+3V3 on L8 "L8" (solid, remove dead copper, pour order 368): 23,24.6 23,24.1 22.8,23.9 19.9,23.9 18.8,25 18.8,25.6 22,25.6
+VIN_4V2 on L4 (PWR) "L10" (solid, remove dead copper, pour order 357): 22 vertices, not listed, extent 23.8,15.6 39.4,29.6
+1V5_DDR on L4 (PWR) "L4" (solid, remove dead copper, pour order 373): 45 vertices, not listed, extent 23.8,14.2 62.2,75.6
+5V_HDR_J2 on L4 (PWR) "L4" (solid, remove dead copper, pour order 374): 69,68.4 65,68.4 63.4,66.8 62.4,65.8 62.4,62.8 61.4,62.8 59.6,61 59.6,54.8 69,54.8
+3V3 on L4 (PWR) "L4" (solid, remove dead copper, pour order 375): 72 vertices, not listed, extent 1,1 69,94
+1V2_VDD_ARM_CAP on L4 (PWR) "L4" (solid, remove dead copper, pour order 376): 25,48 26.4,49.4 27,49.4 32,49.4 32.6,48.8 33.8,47.6 33.8,45.8 25,45.8
+V_INPUT on L7 (PWR) "L10" (solid, remove dead copper, pour order 362): 5.2,18.2 6.2,18.2 9.2,21.2 12.8,21.2 16.2,17.8 16.4,17.6 17.4,16.6 17.4,15.4 17.4,8 16.6,7.2 15.2,7.2 10.4,7.2 9,8.6 5.2,12.4
+VIN_4V2 on L7 (PWR) "L7" (solid, remove dead copper, pour order 385): 54 vertices, not listed, extent 1,15.2 39.6,94
+3V3_HDR on L7 (PWR) "L10" (solid, remove dead copper, pour order 348): 18.1,94 18.1,87.5 18.4,87.2 20.6,85 27.4,85 48.6,85 49.4,85.8 56.6,85.8 58.8,88 69,88 69,94
+1V5_DDR on L7 (PWR) "L4" (solid, remove dead copper, pour order 372): 51 vertices, not listed, extent 30.4,14.6 62.2,75.6
+2V5 on L7 (PWR) "L7" (solid, remove dead copper, pour order 377): 41 vertices, not listed, extent 13.8,22.2 39.6,69.4
+1V375_SOC on L7 (PWR) "L7" (solid, remove dead copper, pour order 378): 36 vertices, not listed, extent 17,32.4 36.6,61
PMIC_VDDOTP on L7 (PWR) "L7" (solid, remove dead copper, pour order 379): 18 vertices, not listed, extent 59.6,1 69,38.6
+3V3_USB_HUB on L7 (PWR) "L7" (solid, remove dead copper, pour order 380): 18 vertices, not listed, extent 57.8,39 69,81.8
+VDDA on L7 (PWR) "L7" (solid, remove dead copper, pour order 381): 51.6,15.6 52.4,15.6 53.8,14.2 60.8,14.2 62.6,12.4 62.6,10.8 62.6,9.4 61.2,9.4 60,9.4 56.8,9.4 54,6.6 53,6.6 51.6,8
+1V5_DDR on L7 (PWR) "L7" (solid, remove dead copper, pour order 383): 20 vertices, not listed, extent 1,1 35.6,42.2
+5V on L7 (PWR) "L7" (solid, remove dead copper, pour order 384): 17 vertices, not listed, extent 35.2,69.8 69,87.6
+VIN_5V on L7 (PWR) "L7" (solid, remove dead copper, pour order 382): 33 vertices, not listed, extent 17.8,1 62.6,18.8
COMP_1V375 on L10 "L10" (solid, remove dead copper, pour order 634): 17 vertices, not listed, extent 12.3,33.7 14.2,35.9
+MPCIE_SIM_VPP on L10 "L10" (solid, remove dead copper, pour order 354): 17 vertices, not listed, extent 49.5,28.3 52.4,30.5
GND on L10 "L10" (solid, remove dead copper, pour order 345): 19,46.1 19.8,46.1 19.8,46.9 20,47.1 20,47.5 19.8,47.7 19.8,48.5 20.1,48.8 20.1,49 20,49.1 19.5,49.1 18.9,48.5 18.9,46.1
GND on L10 "L10" (solid, remove dead copper, pour order 604): 35 vertices, not listed, extent 12.05,63.85 19.2,70.25
+2V5_ETH_DVDDH on L10 "L10" (solid, remove dead copper, pour order 338): 13,60.7 15.3,60.7 15.3,61.6 13,61.6
+3V3_ETH_AVDDH on L10 "L10" (solid, remove dead copper, pour order 332): 21 vertices, not listed, extent 19.9,70.7 24.45,72.3
GND on L10 "L10" (solid, remove dead copper, pour order 633): 59.6,84.5 59.6,83.6 59.4,83.4 57.8,83.4 57.7,83.5 57.7,84.4 57.8,84.5 59.6,84.5
GND on L10 "L10" (solid, remove dead copper, pour order 632): 17.5,81.3 18.1,81.3 18.4,81 18.5,81 19.2,81 19.6,81.4 19.6,82 19.5,82.1 19.4,82.1 19.2,82.1 19,81.9 18.7,81.9 17.9,81.9 17.6,81.6 17.5,81.5
+5V_MPCIE on L10 "L10" (solid, remove dead copper, pour order 631): 36.7,15.4 36.7,14 36.6,13.9 34.9,13.9 34.6,14.2 34.6,14.3 34.6,14.6 34.8,14.8 35.1,14.8 35.3,15 35.3,15.4 35.9,15.4 35.9,15 36.1,15 36.1,15.4
+1V5_MPCIE on L10 "L10" (solid, remove dead copper, pour order 630): 76 vertices, not listed, extent 31.3,18.5 57.1,26.3
+VIN_4V2 on L10 "L10" (solid, remove dead copper, pour order 629): 31.4,24.3 32.3,24.3 32.5,24.1 32.5,23.9 32.5,23.3 32,22.8 31.9,22.7 31.4,22.7
+1V2_ETH on L10 "L10" (solid, remove dead copper, pour order 628): 18 vertices, not listed, extent 17.4,71.6 19.3,73.5
+3V0_ALWAYS on L10 "L10" (solid, remove dead copper, pour order 627): 1.1,33.8 2,33.8 2.3,34.1 2.3,34.3 1.7,34.9 1.7,35.3 1.7,35.4 1.1,35.4 1.1,34.8 1.2,34.7 1.2,34.5 1.1,34.4 1.1,34.3
+VIN_5V on L10 "L10" (solid, remove dead copper, pour order 626): 67.9,67.4 68.4,66.9 68.7,66.9 68.8,67 68.8,67.9 68.8,68.7 68.7,68.8 68.3,68.8 67.9,68.4 67.9,67.4
+VIN_5V on L10 "L10" (solid, remove dead copper, pour order 622): 46.5,81.8 47.9,81.8 48,81.7 48,80.7 47.9,80.6 47.8,80.6 47.4,80.6 47.1,80.9 47,81 46.5,81
+5V_USB_TOP on L10 "L10" (solid, remove dead copper, pour order 621): 45,81.8 45.3,82.1 45.3,82.6 45.9,83.2 46.3,83.2 46.4,83.1 46.4,82.3 45.9,81.8 45.9,81 45,81
+VIN_5V on L10 "L10" (solid, remove dead copper, pour order 620): 17 vertices, not listed, extent 43,81 44.4,83.2
+5V_USB_BOT on L10 "L10" (solid, remove dead copper, pour order 619): 42,81 42,83 42.2,83.2 42.6,83.2 42.8,83 42.8,81.9 42.9,81.8 42.9,81.2 42.9,81
+5V on L10 "L10" (solid, remove dead copper, pour order 618): 18 vertices, not listed, extent 39.9,80.6 41.7,82.5
+5V_USB_OTG on L10 "L10" (solid, remove dead copper, pour order 571): 23.1,10.3 24,10.3 24,9.2 24.5,8.7 25.4,8.7 25.4,7.5 24.6,7.5 23.8,6.7 22.7,6.7 22.5,6.9 22.5,7.4 23.1,8
+NVCC_ENET on L10 "L10" (solid, remove dead copper, pour order 617): 28 vertices, not listed, extent 31.1,53.5 34.2,57.8
+3V3_USB_HUB on L10 "L10" (solid, remove dead copper, pour order 616): 18 vertices, not listed, extent 61,69.3 64.9,70.4
GND on L10 "L10" (solid, remove dead copper, pour order 615): 57.9,75.5 58.4,75.5 58.9,75 58.9,74.3 59.3,74.3 59.5,74.3 60.7,75.5 60.7,76.1 59.2,76.1 59,76.3 58.6,76.3 58.1,76.3 57.9,76.1
GND on L10 "L10" (solid, remove dead copper, pour order 614): 58.4,73.5 61.2,73.5 61.8,72.9 61.8,72 61.8,71.8 61.6,71.6 58.4,71.6
+3V3_USB_HUB on L10 "L10" (solid, remove dead copper, pour order 613): 59.1,76.5 61.3,76.5 61.4,76.6 61.4,76.8 60.9,77.3 60.6,77.6 59.8,77.6 59.6,77.6 59.2,77.2 59.1,77.1 59.1,76.5
+3V3_HDR on L10 "L10" (solid, remove dead copper, pour order 612): 60,87.4 61.3,87.4 61.5,87.6 61.8,87.9 61.8,89.9 61.6,90.1 61.5,90.1 61.2,90.1 60.9,89.8 60.7,89.6 60.7,89.5 60.7,89.3 60.5,89.1 60,88.6 60,87.4
+5V_FTDI on L10 "L10" (solid, remove dead copper, pour order 611): 37 vertices, not listed, extent 57.1,80.6 68.9,88.6
+3V3 on L10 "L10" (solid, remove dead copper, pour order 610): 55.5,88.6 55.5,87.4 53.8,87.4 53.6,87.6 53.6,87.8 53.6,88.4 53.8,88.6 55.5,88.6
+5V_USB_BOT on L10 "L10" (solid, remove dead copper, pour order 609): 45.4,89.1 45.4,87 48,87 48,87.9 48.7,88.6 48.7,89.5 48.5,89.7 48.2,89.7 47.6,89.1
GND on L10 "L10" (solid, remove dead copper, pour order 608): 34.2,73.5 34.2,71.6 35.7,71.6 35.9,71.8 36.4,72.3 36.4,73.1 36.2,73.1 36,73.3 35.4,73.9 35.2,73.9 34.6,73.9 34.2,73.5
GND on L10 "L10" (solid, remove dead copper, pour order 607): 35.5,68 36.8,68 36.8,66.6 37.3,66.1 37.3,65.3 37.3,65.2 37.1,65 35.8,65 35.5,65.3
GND on L10 "L10" (solid, remove dead copper, pour order 606): 34.3,67.9 34.3,65 34.2,64.9 34,64.9 32.9,64.9 32.6,64.9 31.8,65.7 31.6,65.9 31.6,66.4 31.6,66.6 33,68 34.3,68
+1V2_ETH_AVDDL on L10 "L10" (solid, remove dead copper, pour order 605): 17 vertices, not listed, extent 14.1,70.2 17.8,72.4
GND on L10 "L10" (solid, remove dead copper, pour order 603): 61.9,70.8 64.9,70.8 64.9,71.3 64.2,72 62.7,72 62.6,72 61.9,71.3 61.9,70.8
+5V_HDR_J2 on L10 "L10" (solid, remove dead copper, pour order 602): 21 vertices, not listed, extent 66.4,63.6 68.6,68.2
+5V on L10 "L10" (solid, remove dead copper, pour order 601): 65.8,68.2 65.8,67.4 65.1,67.4 64.5,66.8 64.4,66.7 64.2,66.7 64.1,66.8 64.1,67 63.3,67.8 63.3,68.1 63.4,68.2
GND on L10 "L10" (solid, remove dead copper, pour order 600): 59.5,68.5 60.5,68.5 61,68 61,66.3 61.4,65.9 61.5,65.8 61.5,65.5 61.3,65.3 61,65.3 59.8,65.3 59.8,67.8 59.5,68.1 59.5,68.5
GND on L10 "L10" (solid, remove dead copper, pour order 599): 57.3,68 58.4,68 58.9,67.5 59.1,67.3 59.1,66.5 59.1,65.9 58.5,65.3 57.3,65.3
GND on L10 "L10" (solid, remove dead copper, pour order 598): 62.7,47.4 62.8,47.5 64,47.5 64.1,47.4 64.1,47.3 64.1,46.3 64,46.2 63.8,46.2 63.5,46.5 62.7,46.5
+3V3_HDR on L10 "L10" (solid, remove dead copper, pour order 597): 61.1,46.5 62.3,46.5 62.5,46.7 62.5,47.6 62.4,47.7 62.3,47.7 61.4,47.7 61.1,47.4 61.1,46.5
+3V3_HDR_J2 on L10 "L10" (solid, remove dead copper, pour order 596): 19 vertices, not listed, extent 61.1,43.2 66.4,45.9
+3V3 on L10 "L10" (solid, remove dead copper, pour order 595): 61.1,44.4 61.9,44.4 62.5,43.8 62.5,43.2 62.5,43.1 62.4,43 61.2,43 61,43.2 61,44.4
GND on L10 "L10" (solid, remove dead copper, pour order 594): 57.5,42.7 59.4,42.7 59.6,42.5 59.6,41 59.6,40.9 59.4,40.7 57.5,40.7
GND on L10 "L10" (solid, remove dead copper, pour order 593): 43,42.7 44.6,42.7 46,41.3 46,40.5 45.9,40.4 45.5,40.4 45.2,40.7 44.5,40.7 42.6,40.7 42.4,40.9 42.4,42.1 43,42.7
+MPCIE_SIM_PWR on L10 "L10" (solid, remove dead copper, pour order 592): 38 vertices, not listed, extent 51.3,23.8 56.2,31.1
GND on L10 "L10" (solid, remove dead copper, pour order 591): 60.5,17.6 62.8,17.6 63.5,16.9 64.3,16.1 64.3,15 63.7,14.4 63.4,14.4 61.5,14.4 60.9,13.8 60.5,13.8 60.5,14.4
GND on L10 "L10" (solid, remove dead copper, pour order 590): 21 vertices, not listed, extent 48.6,0.9 54.4,5.6
GND on L10 "L10" (solid, remove dead copper, pour order 589): 30.3,5.6 32.9,5.6 33.4,5.1 33.4,2.1 32.7,1.4 30.3,1.4 30.3,4.3 29.7,4.9 29.7,5.3 30,5.6 30.3,5.6
+VDD_CSI on L10 "L10" (solid, remove dead copper, pour order 588): 36 vertices, not listed, extent 30,1.5 48.4,9.7
GND on L10 "L10" (solid, remove dead copper, pour order 587): 31.5,8.2 31.5,6.8 31.9,6.4 32.9,6.4 33,6.4 33.5,6.9 33.6,7 33.6,7.5 33,7.5 32.3,8.2 31.5,8.2
+3V3 on L10 "L10" (solid, remove dead copper, pour order 586): 30,8.2 30.8,8.2 31.2,7.8 31.3,7.7 31.3,6.5 31,6.2 30,6.2
GND on L10 "L10" (solid, remove dead copper, pour order 585): 33.5,17.6 33.5,13.8 32.6,12.9 31.8,12.9 30.7,14 29.9,14.8 29.9,16.4 30.8,16.4 31.2,16.8 31.2,17.6
+1V5_DDR on L10 "L10" (solid, remove dead copper, pour order 584): 31.4,18.4 31.6,18.2 31.4,18 30.6,18 30.4,18 29.9,18.5 29.8,18.6 29.8,19.4 30.7,19.4 30.7,18.6 30.9,18.4 31.4,18.4
+VIN_4V2 on L10 "L10" (solid, remove dead copper, pour order 583): 28.6,15.5 29.6,15.5 29.7,15.6 29.7,16.8 29.9,17 30.7,17 30.7,17.9 29.7,17.9 29.1,18.5 28.9,18.5 28.6,18.2 28.6,17.8
+VIN_4V2 on L10 "L10" (solid, remove dead copper, pour order 582): 23.65,24.65 23.75,24.55 24.55,24.55 24.7,24.7 24.7,24.75 24.7,25 24.75,25.05 25.15,25.45 25.35,25.45 25.35,27.05 24.45,27.05 23.65,26.25
+VIN_4V2 on L10 "L10" (solid, remove dead copper, pour order 581): 27 vertices, not listed, extent 26.55,22.05 30.1,26.15
GND on L10 "L10" (solid, remove dead copper, pour order 580): 51 vertices, not listed, extent 24.25,22.05 31.85,28.45